# Altium PCB Studio_Clock_hv1.01_PCB_240215a.PcbDoc (part 3 of 5)
Units mm, origin at the board's own origin, x right, y up, seen from the top; angles counter-clockwise.
Board outline 360 x 60 mm, 4 copper layers (TOP, PWR, GND, BOTTOM), stack 0.547 mm thick; 257 components, 289 nets, 969 pads, 664 vias.
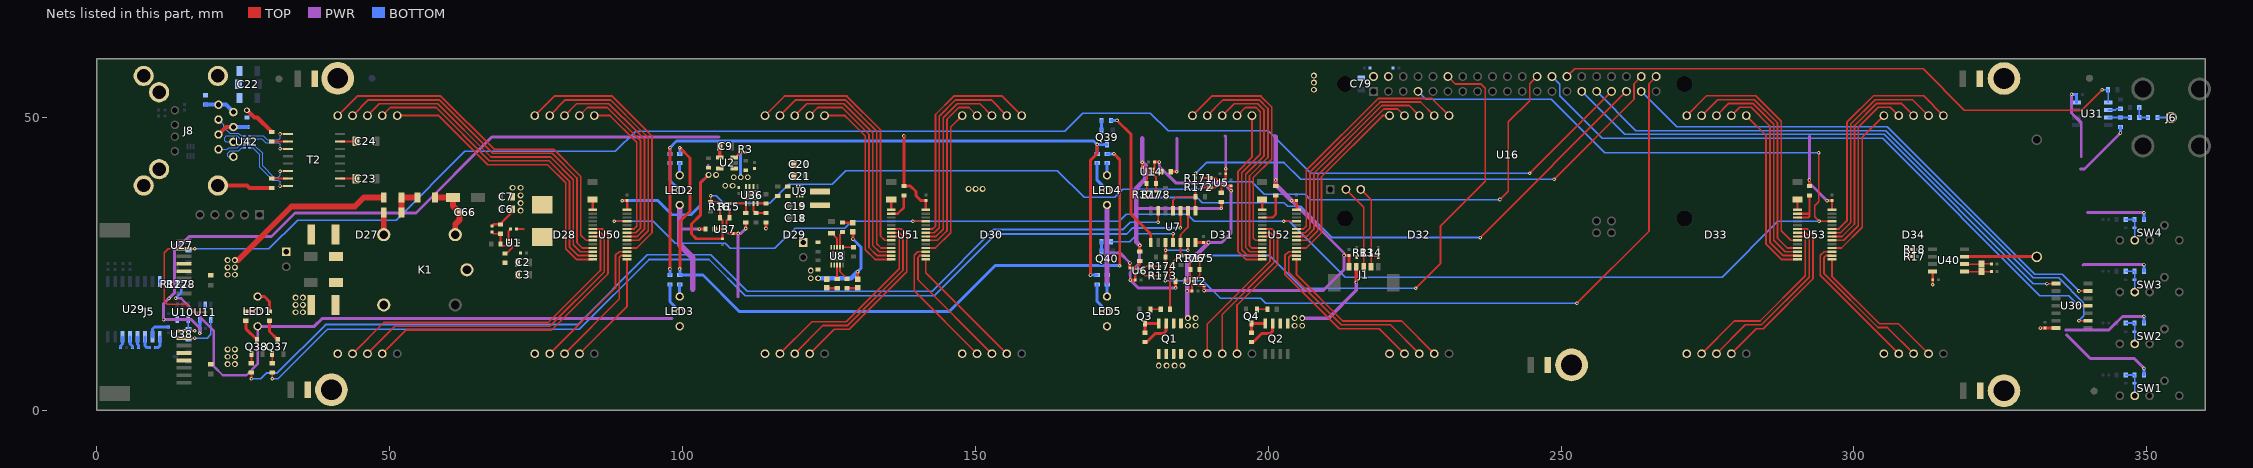
[diagram p4: the nets of this part, all layers, seen from the top]

## Part data (continued)
R5 R6: library part CMP-001-0628-7, "RES 33K OHM 1% 1/10W 0603", MAnufacturer=YAGEO, Op Temp max=155°C, Op Temp min=-55°C, Package="0603 (1608 Metric)", Power=100mW, Ratings=-, Resistance=33K, Temperature Coefficient=±100ppm, Tolerance=1%, Component Type="Chip Resistor", ComponentLink1Description=Datasheet, ComponentLink1URL=https://www.yageo.com/upload/media/product/products/datasheet/rchip/PYu-RC_51_RoHS_P_4.pdf, ComponentLink2Description=Mouser, ComponentLink2URL=https://eu.mouser.com/ProductDetail/YAGEO/RC0603FR-0710KL?qs=grNVn54RoB%252B3GtjbJj3wJQ%3D%3D, ComponentLink3Description=Digikey, ComponentLink3URL=https://www.digikey.com/en/products/detail/yageo/RC0603FR-0710KL/726880?s=N4IgTCBcDaIEoGEAMA2JBmAYnAtEg7AIxIDSAMiALoC%2BQA, Composition="Thick Film", Height max=550µm, Mounting type=SM, MPN=RC0603FR-0733KL, Size="1.60mm x 0.80mm", Size2=0603
R7 R8 R124 R125: library part RC_1206, "RES 0 OHM JUMPER 1/4W 1206", Package="1206 (3216 Metric)", Power=0.25W, Resistance=0E, Datasheet=https://www.yageo.com/upload/media/product/products/datasheet/rchip/PYu-RC_Group_51_RoHS_L_12.pdf, DigiKey=https://www.digikey.com/en/products/detail/yageo/RC1206JR-070RL/729184, MF=YAGEO, MPN=RC1206JR-070RL, Size2=1206
  R124 R125: DNP=DNP, PMNT=DNP
R9 R10 R11 R12: library part CMP-001-0628-7, "RES 75 OHM 1% 1/10W 0603", MAnufacturer=YAGEO, Op Temp max=155°C, Op Temp min=-55°C, Package="0603 (1608 Metric)", Power=100mW, Ratings=-, Resistance=75E, Temperature Coefficient=±100ppm, Tolerance=1%, Component Type="Chip Resistor", ComponentLink1Description=Datasheet, ComponentLink1URL=https://www.yageo.com/upload/media/product/products/datasheet/rchip/PYu-RC_51_RoHS_P_4.pdf, ComponentLink2Description=Mouser, ComponentLink2URL=https://eu.mouser.com/ProductDetail/YAGEO/RC0603FR-0710KL?qs=grNVn54RoB%252B3GtjbJj3wJQ%3D%3D, ComponentLink3Description=Digikey, ComponentLink3URL=https://www.digikey.com/en/products/detail/yageo/RC0603FR-0710KL/726880?s=N4IgTCBcDaIEoGEAMA2JBmAYnAtEg7AIxIDSAMiALoC%2BQA, Composition="Thick Film", Height max=550µm, Mounting type=SM, MPN=RC0603FR-0775RP, PMNT=DNP, Size="1.60mm x 0.80mm", Size2=0603
R13 R14 R15 R16 R130 R171 R172 R173 R174 R175 R176 R177 R178 R198 R205 R206: library part CMP-001-0484-6, "RES 33 OHM 1% 1/16W 0402", MAnufacturer=YAGEO, Op Temp max=155°C, Op Temp min=-55°C, Package="0402 (1005 Metric)", Package2=0402, Power=63mW, Ratings=-, Resistance=33, Temperature Coefficient=±100ppm, Tolerance=1%, Component Type="Chip Resistor", ComponentLink1Description=Datasheet, ComponentLink1URL=https://www.yageo.com/upload/media/product/productsearch/datasheet/rchip/PYu-RC_Group_51_RoHS_L_12.pdf, ComponentLink2Description=Mouser, ComponentLink2URL=https://eu.mouser.com/ProductDetail/YAGEO/RC0402FR-0727RL?qs=UOUeRUa%252B8Wlb37UyFHw9Bw%3D%3D, ComponentLink3Description=Digikey, ComponentLink3URL=https://www.digikey.com/en/products/detail/yageo/RC0402FR-0727RL/5280946, Composition="Thick Film", Height max=400µm, Mounting type=SM, MPN=RC0402FR-0733RL, Size="1.00mm x 0.50mm"
R17 R18: library part CMP-001-0484-6, "RES 4K7 OHM 1% 1/16W 0402", MAnufacturer=YAGEO, Op Temp max=155°C, Op Temp min=-55°C, Package="0402 (1005 Metric)", Package2=0402, Power=63mW, Ratings=-, Resistance=4K7, Temperature Coefficient=±100ppm, Tolerance=1%, Component Type="Chip Resistor", ComponentLink1Description=Datasheet, ComponentLink1URL=https://www.yageo.com/upload/media/product/productsearch/datasheet/rchip/PYu-RC_Group_51_RoHS_L_12.pdf, ComponentLink2Description=Mouser, ComponentLink2URL=https://eu.mouser.com/ProductDetail/YAGEO/RC0402FR-0727RL?qs=UOUeRUa%252B8Wlb37UyFHw9Bw%3D%3D, ComponentLink3Description=Digikey, ComponentLink3URL=https://www.digikey.com/en/products/detail/yageo/RC0402FR-0727RL/5280946, Composition="Thick Film", Height max=400µm, Mounting type=SM, MPN=RC0402FR-074K7L, Size="1.00mm x 0.50mm"
R19 R179 R181 R183 R185: library part CMP-001-0628-7, "RES 91 OHM 5% 1/10W 0603", MAnufacturer=YAGEO, Op Temp max=155°C, Op Temp min=-55°C, Package="0603 (1608 Metric)", Power=100mW, Ratings=-, Resistance=91E, Temperature Coefficient=±100ppm, Tolerance=1%, Component Type="Chip Resistor", ComponentLink1Description=Datasheet, ComponentLink1URL=https://www.yageo.com/upload/media/product/products/datasheet/rchip/PYu-RC_51_RoHS_P_4.pdf, ComponentLink2Description=Mouser, ComponentLink2URL=https://eu.mouser.com/ProductDetail/YAGEO/RC0603FR-0710KL?qs=grNVn54RoB%252B3GtjbJj3wJQ%3D%3D, ComponentLink3Description=Digikey, ComponentLink3URL=https://www.digikey.com/en/products/detail/yageo/RC0603FR-0710KL/726880?s=N4IgTCBcDaIEoGEAMA2JBmAYnAtEg7AIxIDSAMiALoC%2BQA, Composition="Thick Film", Height max=550µm, Mounting type=SM, MPN=RC0603JR-0791RL, PMNT=DNP, Size="1.60mm x 0.80mm", Size2=0603
R20 R180 R182 R184 R186: library part CMP-001-0628-7, "RES 150 OHM 5% 1/10W 0603", MAnufacturer=YAGEO, Op Temp max=155°C, Op Temp min=-55°C, Package="0603 (1608 Metric)", Power=100mW, Ratings=-, Resistance=150E, Temperature Coefficient=±100ppm, Tolerance=1%, Component Type="Chip Resistor", ComponentLink1Description=Datasheet, ComponentLink1URL=https://www.yageo.com/upload/media/product/products/datasheet/rchip/PYu-RC_51_RoHS_P_4.pdf, ComponentLink2Description=Mouser, ComponentLink2URL=https://eu.mouser.com/ProductDetail/YAGEO/RC0603FR-0710KL?qs=grNVn54RoB%252B3GtjbJj3wJQ%3D%3D, ComponentLink3Description=Digikey, ComponentLink3URL=https://www.digikey.com/en/products/detail/yageo/RC0603FR-0710KL/726880?s=N4IgTCBcDaIEoGEAMA2JBmAYnAtEg7AIxIDSAMiALoC%2BQA, Composition="Thick Film", Height max=550µm, Mounting type=SM, MPN=RC0603JR-07150RL, Size="1.60mm x 0.80mm", Size2=0603
R21 R187 R189 R191: library part RC_1206, "RES 910 OHM 1% 1/4W 1206", Package="1206 (3216 Metric)", Power=0.25W, Resistance=910E, Datasheet=https://www.yageo.com/upload/media/product/products/datasheet/rchip/PYu-RC_Group_51_RoHS_L_12.pdf, DigiKey=https://www.digikey.com/en/products/detail/yageo/RC1206FR-10910RL/14286762, MF=YAGEO, MPN=RC1206FR-10910RL, Size2=1206
R38 R39: library part CMP-001-0628-7, "RES 2.7K OHM 1% 1/10W 0603", MAnufacturer=YAGEO, Op Temp max=155°C, Op Temp min=-55°C, Package="0603 (1608 Metric)", Power=100mW, Ratings=-, Resistance=2K7, Temperature Coefficient=±100ppm, Tolerance=1%, Component Type="Chip Resistor", ComponentLink1Description=Datasheet, ComponentLink1URL=https://www.yageo.com/upload/media/product/products/datasheet/rchip/PYu-RC_51_RoHS_P_4.pdf, ComponentLink2Description=Mouser, ComponentLink2URL=https://eu.mouser.com/ProductDetail/YAGEO/RC0603FR-0710KL?qs=grNVn54RoB%252B3GtjbJj3wJQ%3D%3D, ComponentLink3Description=Digikey, ComponentLink3URL=https://www.digikey.com/en/products/detail/yageo/RC0603FR-0710KL/726880?s=N4IgTCBcDaIEoGEAMA2JBmAYnAtEg7AIxIDSAMiALoC%2BQA, Composition="Thick Film", Height max=550µm, Mounting type=SM, MPN=RC0603FR-072K7L, Size="1.60mm x 0.80mm", Size2=0603
R40 R41: library part CMP-001-0628-7, "RES 4.7K OHM 1% 1/10W 0603", MAnufacturer=YAGEO, Op Temp max=155°C, Op Temp min=-55°C, Package="0603 (1608 Metric)", Power=100mW, Ratings=-, Resistance=4K7, Temperature Coefficient=±100ppm, Tolerance=1%, Component Type="Chip Resistor", ComponentLink1Description=Datasheet, ComponentLink1URL=https://www.yageo.com/upload/media/product/products/datasheet/rchip/PYu-RC_51_RoHS_P_4.pdf, ComponentLink2Description=Mouser, ComponentLink2URL=https://eu.mouser.com/ProductDetail/YAGEO/RC0603FR-0710KL?qs=grNVn54RoB%252B3GtjbJj3wJQ%3D%3D, ComponentLink3Description=Digikey, Composition="Thick Film", Height max=550µm, Mounting type=SM, MPN=RC0603FR-074K7L, PMNT=DNP, Size="1.60mm x 0.80mm", Size2=0603
  R40: ComponentLink3URL=https://www.digikey.pl/en/products/detail/yageo/rc0603fr-074k7l/727212
  R41: ComponentLink3URL=https://www.digikey.com/en/products/detail/yageo/RC0603FR-0710KL/726880?s=N4IgTCBcDaIEoGEAMA2JBmAYnAtEg7AIxIDSAMiALoC%2BQA
R42 R48 R74 R160: library part CMP-001-0628-7, "RES 0 OHM JUMPER 1/10W 0603", MAnufacturer=YAGEO, MPN=RC0603FR-0710KL, Op Temp max=155°C, Op Temp min=-55°C, Package="0603 (1608 Metric)", Power=100mW, Ratings=-, Temperature Coefficient=±100ppm, Tolerance=1%, Component Type="Chip Resistor", ComponentLink1Description=Datasheet, ComponentLink1URL=https://www.yageo.com/upload/media/product/products/datasheet/rchip/PYu-RC_51_RoHS_P_4.pdf, ComponentLink2Description=Mouser, ComponentLink2URL=https://eu.mouser.com/ProductDetail/YAGEO/RC0603FR-0710KL?qs=grNVn54RoB%252B3GtjbJj3wJQ%3D%3D, ComponentLink3Description=Digikey, ComponentLink3URL=https://www.digikey.com/en/products/detail/yageo/RC0603FR-0710KL/726880?s=N4IgTCBcDaIEoGEAMA2JBmAYnAtEg7AIxIDSAMiALoC%2BQA, Composition="Thick Film", DNP=DNP, Height max=550µm, Mounting type=SM, PMNT=DNP, Resistance=DNP, Size="1.60mm x 0.80mm", Size2=0603
R43 R49 R69 R75: library part CMP-001-0628-7, "RES 0 OHM JUMPER 1/10W 0603", MAnufacturer=YAGEO, MPN=RC0603FR-0710KL, Op Temp max=155°C, Op Temp min=-55°C, Package="0603 (1608 Metric)", Power=100mW, Ratings=-, Resistance=0E, Temperature Coefficient=±100ppm, Tolerance=1%, Component Type="Chip Resistor", ComponentLink1Description=Datasheet, ComponentLink1URL=https://www.yageo.com/upload/media/product/products/datasheet/rchip/PYu-RC_51_RoHS_P_4.pdf, ComponentLink2Description=Mouser, ComponentLink2URL=https://eu.mouser.com/ProductDetail/YAGEO/RC0603FR-0710KL?qs=grNVn54RoB%252B3GtjbJj3wJQ%3D%3D, ComponentLink3Description=Digikey, ComponentLink3URL=https://www.digikey.com/en/products/detail/yageo/RC0603FR-0710KL/726880?s=N4IgTCBcDaIEoGEAMA2JBmAYnAtEg7AIxIDSAMiALoC%2BQA, Composition="Thick Film", Height max=550µm, Mounting type=SM, PMNT=DNP, Size="1.60mm x 0.80mm", Size2=0603
R45 R51 R71 R77 R161: library part CMP-001-0628-7, "RES SMD 5.6K OHM 5% 1/10W 0603", MAnufacturer=YAGEO, MPN=DNP, Op Temp max=155°C, Op Temp min=-55°C, Package="0603 (1608 Metric)", Power=100mW, Ratings=-, Resistance=5K6, Temperature Coefficient=±100ppm, Tolerance=1%, Component Type="Chip Resistor", ComponentLink1Description=Datasheet, ComponentLink1URL=https://www.yageo.com/upload/media/product/products/datasheet/rchip/PYu-RC_51_RoHS_P_4.pdf, ComponentLink2Description=Mouser, ComponentLink2URL=https://eu.mouser.com/ProductDetail/YAGEO/RC0603FR-0710KL?qs=grNVn54RoB%252B3GtjbJj3wJQ%3D%3D, ComponentLink3Description=Digikey, ComponentLink3URL=https://www.digikey.com/en/products/detail/yageo/RC0603FR-0710KL/726880?s=N4IgTCBcDaIEoGEAMA2JBmAYnAtEg7AIxIDSAMiALoC%2BQA, Composition="Thick Film", Height max=550µm, Mounting type=SM, Size="1.60mm x 0.80mm", Size2=0603
  R161: DNP=DNP
R46 R47 R53 R55: library part CMP-001-0628-7, "RES 2.2K OHM 1% 1/10W 0603", MAnufacturer=YAGEO, Op Temp max=155°C, Op Temp min=-55°C, Package="0603 (1608 Metric)", Power=100mW, Ratings=-, Resistance=2K2, Temperature Coefficient=±100ppm, Tolerance=1%, Component Type="Chip Resistor", ComponentLink1Description=Datasheet, ComponentLink1URL=https://www.yageo.com/upload/media/product/products/datasheet/rchip/PYu-RC_51_RoHS_P_4.pdf, ComponentLink2Description=Mouser, ComponentLink2URL=https://eu.mouser.com/ProductDetail/YAGEO/RC0603FR-0710KL?qs=grNVn54RoB%252B3GtjbJj3wJQ%3D%3D, ComponentLink3Description=Digikey, Composition="Thick Film", Height max=550µm, Mounting type=SM, MPN=RC0603FR-072K2L, PMNT=DNP, Size="1.60mm x 0.80mm", Size2=0603
  R46 R47: ComponentLink3URL=https://www.digikey.com/en/products/detail/yageo/RC0603FR-0710KL/726880?s=N4IgTCBcDaIEoGEAMA2JBmAYnAtEg7AIxIDSAMiALoC%2BQA
  R53 R55: ComponentLink3URL=https://www.digikey.pl/en/products/detail/yageo/rc0603fr-072k2l/727016
R56 R57 R58: library part CMP-001-0628-7, "RES 470 OHM 1% 1/10W 0603", MAnufacturer=YAGEO, Op Temp max=155°C, Op Temp min=-55°C, Package="0603 (1608 Metric)", Power=100mW, Ratings=-, Resistance=470E, Temperature Coefficient=±100ppm, Tolerance=1%, Component Type="Chip Resistor", ComponentLink1Description=Datasheet, ComponentLink1URL=https://www.yageo.com/upload/media/product/products/datasheet/rchip/PYu-RC_51_RoHS_P_4.pdf, ComponentLink2Description=Mouser, ComponentLink2URL=https://eu.mouser.com/ProductDetail/YAGEO/RC0603FR-0710KL?qs=grNVn54RoB%252B3GtjbJj3wJQ%3D%3D, ComponentLink3Description=Digikey, ComponentLink3URL=https://www.digikey.com/en/products/detail/yageo/RC0603FR-0710KL/726880?s=N4IgTCBcDaIEoGEAMA2JBmAYnAtEg7AIxIDSAMiALoC%2BQA, Composition="Thick Film", Height max=550µm, Mounting type=SM, MPN=RC0603FR-07470RL, Size="1.60mm x 0.80mm", Size2=0603
R59: library part CMP-001-0628-7, "RES 732K OHM 1% 1/10W 0603", MAnufacturer=YAGEO, Op Temp max=155°C, Op Temp min=-55°C, Package="0603 (1608 Metric)", Power=100mW, Ratings=-, Resistance=732K, Temperature Coefficient=±100ppm, Tolerance=1%, Component Type="Chip Resistor", ComponentLink1Description=Datasheet, ComponentLink1URL=https://www.digikey.ee/en/products/detail/yageo/rc0603fr-07100rp/4935304, ComponentLink3Description=Digikey, ComponentLink3URL=https://www.digikey.com/en/products/detail/yageo/rc0603fr-07732kl/727376, Composition="Thick Film", Height max=550µm, Mounting type=SM, MPN=RC0603FR-07732KL, Size="1.60mm x 0.80mm", Size2=0603
R61 R154: library part CMP-001-0628-7, "RES 1K OHM 1% 1/10W 0603", MAnufacturer=YAGEO, Op Temp max=155°C, Op Temp min=-55°C, Package="0603 (1608 Metric)", Power=100mW, Ratings=-, Resistance=1K, Temperature Coefficient=±100ppm, Tolerance=1%, Component Type="Chip Resistor", ComponentLink1Description=Datasheet, ComponentLink1URL=https://www.digikey.ee/en/products/detail/yageo/rc0603fr-07100rp/4935304, ComponentLink3Description=Digikey, ComponentLink3URL=https://www.digikey.com/en/products/detail/yageo/RC0603FR-0710KL/726880?s=N4IgTCBcDaIEoGEAMA2JBmAYnAtEg7AIxIDSAMiALoC%2BQA, Composition="Thick Film", Height max=550µm, Mounting type=SM, MPN=RC0603FR-071KL, Size="1.60mm x 0.80mm", Size2=0603
R62: library part CMP-001-0694-4, "THERMISTOR NTC 10KOHM 3570K 0805", MAnufacturer="Vishay Beyschlag/Draloric/BC Components", Op Temp max=155°C, Package="0805 (2012 Metric)", Resistance=10K, Tolerance=±3%, Component Type="Chip Resistor", ComponentLink1Description=Datasheet, ComponentLink1URL=https://www.vishay.com/docs/29044/ntcs0805e3t.pdf, ComponentLink3Description=Digikey, ComponentLink3URL=https://www.digikey.com/en/products/detail/vishay-beyschlag-draloric-bc-components/ntcs0805e3103hmt/2237369, Mounting type=SM, MPN=NTCS0805E3103HMT, Size2=0805
R63 R199 R200: library part CMP-001-0628-7, "RES 100K OHM 1% 1/10W 0603", MAnufacturer=YAGEO, Op Temp max=155°C, Op Temp min=-55°C, Package="0603 (1608 Metric)", Power=100mW, Ratings=-, Resistance=100K, Temperature Coefficient=±100ppm, Tolerance=1%, Component Type="Chip Resistor", ComponentLink1Description=Datasheet, ComponentLink3Description=Digikey, Composition="Thick Film", Height max=550µm, Mounting type=SM, MPN=RC0603FR-07100KL, Size="1.60mm x 0.80mm", Size2=0603
  R63: ComponentLink1URL=https://www.digikey.ee/en/products/detail/yageo/rc0603fr-07100rp/4935304, ComponentLink3URL=https://www.digikey.com/en/products/detail/yageo/rc0603fr-07100kl/726889
  R199 R200: ComponentLink1URL=https://www.yageo.com/upload/media/product/products/datasheet/rchip/PYu-RC_51_RoHS_P_4.pdf, ComponentLink2Description=Mouser, ComponentLink2URL=https://eu.mouser.com/ProductDetail/YAGEO/RC0603FR-0710KL?qs=grNVn54RoB%252B3GtjbJj3wJQ%3D%3D, ComponentLink3URL=https://www.digikey.com/en/products/detail/yageo/RC0603FR-0710KL/726880?s=N4IgTCBcDaIEoGEAMA2JBmAYnAtEg7AIxIDSAMiALoC%2BQA
R67: library part CMP-001-0628-7, "RES 0 OHM JUMPER 1/10W 0603", MAnufacturer=YAGEO, MPN=RC0603FR-0710KL, Op Temp max=155°C, Op Temp min=-55°C, Package="0603 (1608 Metric)", Power=100mW, Ratings=-, Resistance=DNP, Temperature Coefficient=±100ppm, Tolerance=1%, Component Type="Chip Resistor", ComponentLink1Description=Datasheet, ComponentLink1URL=https://www.yageo.com/upload/media/product/products/datasheet/rchip/PYu-RC_51_RoHS_P_4.pdf, ComponentLink2Description=Mouser, ComponentLink2URL=https://eu.mouser.com/ProductDetail/YAGEO/RC0603FR-0710KL?qs=grNVn54RoB%252B3GtjbJj3wJQ%3D%3D, ComponentLink3Description=Digikey, ComponentLink3URL=https://www.digikey.com/en/products/detail/yageo/RC0603FR-0710KL/726880?s=N4IgTCBcDaIEoGEAMA2JBmAYnAtEg7AIxIDSAMiALoC%2BQA, Composition="Thick Film", DNP=DNP, Height max=550µm, Mounting type=SM, PMNT=DNP, Size="1.60mm x 0.80mm", Size2=0603
R92 R93 R94 R95 R96: library part SMD_RESISTOR, Voltage=50V, DNP=DNP, Foot Print Size=1210, PCB Footprint=r_sm_1210, Tollerance=5%
R126: library part RT1206BRD07100RL, "RES 330 OHM 5% 1/4W 1206", Package="1206 (3216 Metric)", Power=0.25W, Resistance=330E, Tolerance=5%, Datasheet=https://www.yageo.com/upload/media/product/app/datasheet/rchip/pyu-rt_1-to-0.01_rohs_l.pdf, DigiKey=https://www.digikey.sk/en/products/detail/yageo/RT1206BRD07130RL/1079510, MF=YAGEO, MPN=RC1206JR-07330RL, Size=1206
R133: library part CMP-001-0484-6, "RES SMD 0 OHM JUMPER 1/16W 0402", MAnufacturer=YAGEO, Op Temp max=155°C, Op Temp min=-55°C, Package="0402 (1005 Metric)", Power=63mW, Ratings=-, Resistance=0E, Temperature Coefficient=±100ppm, Tolerance=Jumper, Component Type="Chip Resistor", ComponentLink1Description=Datasheet, ComponentLink1URL=https://www.yageo.com/upload/media/product/productsearch/datasheet/rchip/PYu-RC_Group_51_RoHS_L_12.pdf, ComponentLink2Description=Mouser, ComponentLink2URL=https://eu.mouser.com/ProductDetail/YAGEO/RC0402FR-0727RL?qs=UOUeRUa%252B8Wlb37UyFHw9Bw%3D%3D, ComponentLink3Description=Digikey, ComponentLink3URL=https://www.digikey.com/en/products/detail/yageo/RC0402FR-0727RL/5280946, Composition="Thick Film", Height max=400µm, Mounting type=SM, MPN=AC0402JR-070RL, Size="1.00mm x 0.50mm"
R156: library part CMP-001-0628-7, "RES 402 OHM 1% 1/10W 0603", MAnufacturer=YAGEO, Op Temp max=155°C, Op Temp min=-55°C, Package="0603 (1608 Metric)", Power=100mW, Ratings=-, Resistance=402E, Temperature Coefficient=±100ppm, Tolerance=1%, Component Type="Chip Resistor", ComponentLink1Description=Datasheet, ComponentLink1URL=https://www.yageo.com/upload/media/product/products/datasheet/rchip/PYu-RC_51_RoHS_P_4.pdf, ComponentLink2Description=Mouser, ComponentLink2URL=https://eu.mouser.com/ProductDetail/YAGEO/RC0603FR-0710KL?qs=grNVn54RoB%252B3GtjbJj3wJQ%3D%3D, ComponentLink3Description=Digikey, ComponentLink3URL=https://www.digikey.com/en/products/detail/yageo/RC0603FR-0710KL/726880?s=N4IgTCBcDaIEoGEAMA2JBmAYnAtEg7AIxIDSAMiALoC%2BQA, Composition="Thick Film", Height max=550µm, Mounting type=SM, MPN=RC0603FR-07402RP, PMNT=DNP, Size="1.60mm x 0.80mm", Size2=0603
R159: library part CMP-001-0628-7, "RES 0 OHM JUMPER 1/10W 0603", MAnufacturer=YAGEO, Op Temp max=155°C, Op Temp min=-55°C, Package="0603 (1608 Metric)", Power=100mW, Ratings=-, Resistance=0E, Temperature Coefficient=±100ppm, Tolerance=1%, Component Type="Chip Resistor", ComponentLink1Description=Datasheet, ComponentLink1URL=https://www.yageo.com/upload/media/product/products/datasheet/rchip/PYu-RC_51_RoHS_P_4.pdf, ComponentLink2Description=Mouser, ComponentLink2URL=https://eu.mouser.com/ProductDetail/YAGEO/RC0603FR-0710KL?qs=grNVn54RoB%252B3GtjbJj3wJQ%3D%3D, ComponentLink3Description=Digikey, ComponentLink3URL=https://www.digikey.com/en/products/detail/yageo/RC0603FR-0710KL/726880?s=N4IgTCBcDaIEoGEAMA2JBmAYnAtEg7AIxIDSAMiALoC%2BQA, Composition="Thick Film", Height max=550µm, Mounting type=SM, MPN=RC0603FR-0710KL, PMNT=DNP, Size="1.60mm x 0.80mm", Size2=0603
R201: library part CMP-001-0628-7, "RES 51K OHM 1% 1/10W 0603", MAnufacturer=YAGEO, Op Temp max=155°C, Op Temp min=-55°C, Package="0603 (1608 Metric)", Power=100mW, Ratings=-, Resistance=51K, Temperature Coefficient=±100ppm, Tolerance=1%, Component Type="Chip Resistor", ComponentLink1Description=Datasheet, ComponentLink1URL=https://www.yageo.com/upload/media/product/products/datasheet/rchip/PYu-RC_51_RoHS_P_4.pdf, ComponentLink2Description=Mouser, ComponentLink2URL=https://eu.mouser.com/ProductDetail/YAGEO/RC0603FR-0710KL?qs=grNVn54RoB%252B3GtjbJj3wJQ%3D%3D, ComponentLink3Description=Digikey, ComponentLink3URL=https://www.digikey.com/en/products/detail/yageo/RC0603FR-0710KL/726880?s=N4IgTCBcDaIEoGEAMA2JBmAYnAtEg7AIxIDSAMiALoC%2BQA, Composition="Thick Film", Height max=550µm, Mounting type=SM, MPN=RC0603FR-0751KP, Size="1.60mm x 0.80mm", Size2=0603
R1588: library part CMP-001-0628-7, "RES 32.4K OHM 1% 1/10W 0603", MAnufacturer=YAGEO, Op Temp max=155°C, Op Temp min=-55°C, Package="0603 (1608 Metric)", Power=100mW, Ratings=-, Resistance=32K4, Temperature Coefficient=±100ppm, Tolerance=1%, Component Type="Chip Resistor", ComponentLink1Description=Datasheet, ComponentLink1URL=https://www.yageo.com/upload/media/product/products/datasheet/rchip/PYu-RC_51_RoHS_P_4.pdf, ComponentLink2Description=Mouser, ComponentLink2URL=https://eu.mouser.com/ProductDetail/YAGEO/RC0603FR-0710KL?qs=grNVn54RoB%252B3GtjbJj3wJQ%3D%3D, ComponentLink3Description=Digikey, ComponentLink3URL=https://www.digikey.com/en/products/detail/yageo/RC0603FR-0710KL/726880?s=N4IgTCBcDaIEoGEAMA2JBmAYnAtEg7AIxIDSAMiALoC%2BQA, Composition="Thick Film", Height max=550µm, Mounting type=SM, MPN=RC0603FR-0732K4L, PMNT=DNP, Size="1.60mm x 0.80mm", Size2=0603
SW1 SW2 SW3 SW4: "SWITCH PUSH SPDT 0.4VA 28V", Mfr_Name="NKK Switches", Voltage=28V, ComponentLink1Description=Datasheet, ComponentLink1URL=https://www.nkkswitches.com/pdf/Apushbuttons.pdf, ComponentLink2Description=DigiKey, ComponentLink2URL=https://www.digikey.ee/en/products/detail/nkk-switches/AB15AV-FA/1055811, MPN=AB15AV-FA, Type=SPDT
T2: "MODULE XFRMR SGL ETHR LAN 16SOIC", Mfr_Name="Pulse Electronics Corporation", ComponentLink1Description=DigiKey, ComponentLink1URL=https://www.digikey.com/en/products/detail/pulse-electronics/HX1188/754321, Copyright="Copyright (C) 2024 Ultra Librarian. All rights reserved.", MPN=HX1188FNL, RefDes=RefDes, Type=DEV
U1: "IC REG BUCK ADJ 2A SOT563", Current - Output=2A, Frequency - Switching=580kHz, Mfr_Name="Texas Instruments", Voltage - Input (Max)=17V, Voltage - Input (Min)=4.3V, ComponentLink1Description=DigiKey, ComponentLink1URL=https://www.digikey.com/en/products/detail/texas-instruments/tps562207drlr/13213542, MPN=TPS562207DRLR
U2: "IC REG LINEAR 3.3V 300MA SOT23-5", Mfr_Name="Richtek Technology", MPN=RT9193-33GB
U5 U6 U12 U14: "IC TRANSLTR BIDIRECTIONAL 6XSON", Mfr_Name=Nexperia, Voltage min="1.2 V", Moltage max="5.5 V", MPN=74LVCH1T45GM,132
U7: "IC GATE AND 4CH 2-INP 14SOIC", Package="SOIC-14 ON", Voltage="4.5V - 5.5V", MF=onsemi, MPN=74ACT08SC
U8: library part MCP73833T-AMIMF, "IC BATT CONTRL LI-ION 1CEL 10DFN", Battery Pack Voltage=4.2V, Charge Current - Max=1.1A, Mfr_Name=Microchip, Voltage - Supply (Max)=6V, MPN=MCP73833T-AMI/MF
U9: "IC REG BOOST ADJ 3A SOT563", Current - Output=3A, Frequency - Switching=1MHz, Mfr_Name="Texas Instruments", Voltage - Input (Max)=5.5V, Voltage - Input (Min)=0.5V, ComponentLink1Description=DigiKey, ComponentLink1URL=https://www.digikey.com/en/products/detail/texas-instruments/tps61023drlt/11310622, ComponentLink2Description=Datasheet, ComponentLink2URL=https://www.ti.com/general/docs/suppproductinfo.tsp?distId=10&gotoUrl=https%3A%2F%2Fwww.ti.com%2Flit%2Fgpn%2Ftps61023, Manufacturer_Part_Number=TPS61023DRLT
U10 U11: "IC BUFFER NON-INVERT 5.5V 5TSOP", Logic Type="Buffer, Non-Inverting", Manufacturer_Part_Number=M74VHC1GT50DTT1G, MPN=M74VHC1GT50DTT1G
U16: "Single board computer", ComponentLink1Description=Datasheet, ComponentLink1URL=https://wiki.banana-pi.org/Banana_Pi_BPI-M2_ZERO
U27 U28 U38 U39: "TVS DIODE 24VWM 70VC TO236AB", Current - Peak Pulse (10/1000µs)="3A (8/20µs)", Mfr_Name=Nexperia, Voltage - Reverse Standoff (Typ)=24V, ComponentLink1Description=DigiKey, ComponentLink1URL=https://www.digikey.at/en/products/detail/nexperia-usa-inc/pesd1can-215/1157428, ComponentLink2Description=Datasheet, ComponentLink2URL=https://assets.nexperia.com/documents/data-sheet/PESD1CAN.pdf, MPN=PESD1CAN,215, Type=DEV
U29: "IC TRANSCEIVER FULL 2/2 16SOIC", Mfr_Name="Texas Instruments", Copyright="Copyright (C) 2024 Ultra Librarian. All rights reserved.", MPN=MAX232DWG4, RefDes=RefDes, Type=DEV
U30: "IC INVERT SCHMITT 6CH 1IN 14SOIC", Mfr_Name=onsemi, Supply Voltage max=5.5V, Supply Voltage min=2V, ComponentLink1Description=DigiKey, ComponentLink1URL=https://www.digikey.at/en/products/detail/onsemi/MC74VHC14DG/1480797?s=N4IgTCBcDaILIGEDsAWAagCQQRhQEQHEQBdAXyA, ComponentLink2Description="New link", ComponentLink2URL=https://www.onsemi.com/pdf/datasheet/mc74vhc14-d.pdf, Logic Type=Inverter, MPN=MC74VHC14DG
U31: library part MCP602T-ISN, "No Description Available", Mfr_Name=Microchip, Copyright="Copyright (C) 2024 Ultra Librarian. All rights reserved.", MPN=MCP602T-I/SN, RefDes=RefDes, Type=DEV
U36: "IC OR CTRLR SRC SELECT 8SON", Current - Output (Max)=1.25A, Mfr_Name="Texas Instruments", Voltage - Supply="2.8V ~ 5.5V", ComponentLink1Description=DigiKey, ComponentLink1URL=https://www.digikey.com/en/products/detail/texas-instruments/TPS2113ADRBR/2353703?s=N4IgTCBcDaICoAUDKYCMqDMBBAIgJQCE8QBdAXyA, ComponentLink2Description=Datasheet, ComponentLink2URL=https://www.ti.com/general/docs/suppproductinfo.tsp?distId=10&gotoUrl=https%3A%2F%2Fwww.ti.com%2Flit%2Fgpn%2Ftps2113a, MPN=TPS2113ADRBR, Type="Source Selector Switch"
U37: "IC TRANSLTR BIDIRECTIONAL 6XSON", Voltage min="1.2 V", DNP=DNP, Moltage max="5.5 V", MPN=74LVCH1T45GM,132, PMT=DNP
U40: library part DS1338Z-33+TR, "IC RTC CLK/CALENDAR I2C 8SOIC", Operating Temperature MAX="+ 85°C", Operating Temperature MIN=-40°C, Package=SOIC-8, Voltage - Supply="3V ~ 5.5V", Voltage - Supply, Battery="1.3V ~ 3.7V", ComponentLink1Description=Datasheet, ComponentLink1URL=https://www.analog.com/media/en/technical-documentation/data-sheets/DS1338-DS1338Z.pdf, ComponentLink2Description=DigiKey, ComponentLink2URL=https://www.digikey.ee/en/products/detail/analog-devices-inc-maxim-integrated/DS1338Z-33-T-R/1196924, MFN=DS1338Z-33+T&R
U42: "TVS DIODE 3.6VWM 14VC 10USON", Mfr_Name="Texas Instruments", ComponentLink1Description=DigiKey, ComponentLink1URL=https://www.digikey.com/en/products/detail/texas-instruments/esd224dqar/8601783, ComponentLink2Description=Datashet, ComponentLink2URL=https://www.ti.com/general/docs/suppproductinfo.tsp?distId=10&gotoUrl=https%3A%2F%2Fwww.ti.com%2Flit%2Fgpn%2Fesd224, Copyright="Copyright (C) 2024 Ultra Librarian. All rights reserved.", MPN=ESD224DQAR, RefDes=RefDes, Type=DEV
U50 U51 U52 U53: "IC LED DRV LIN I2C 120MA 28TSSOP", Mfr_Name="Texas Instruments", ComponentLink1Description=Datasheet, ComponentLink1URL=https://www.ti.com/lit/ds/symlink/tlc59116-q1.pdf?ts=1707339950007&ref_url=https%253A%252F%252Fwww.ti.com%252Fproduct%252FTLC59116-Q1, ComponentLink2Description=DigiKey, ComponentLink2URL=https://www.digikey.com/en/products/detail/texas-instruments/tlc59116itpwrq1/6005364, Copyright="Copyright (C) 2024 Ultra Librarian. All rights reserved.", MPN=TLC59116ITPWRQ1, RefDes=RefDes, Type=DEV
XTAL1: "CRYSTAL 32.7680KHZ 9PF SMD", Frequency="32.768 kHz", Mfr_Name=Epson, MPN="FC2012AN 32.768K-90NN60KD7"
SS1 SS2 SS3 SS4 SS5: CLASS=IC, PCB Footprint=spacer_139t

## Via types
v1: diameter 0.6, hole 0.3, TOP to BOTTOM, 539 vias
v2: diameter 1, hole 0.6, TOP to BOTTOM, 125 vias

## Nets (pads, with @x,y where several pads share a name; then routed paths per layer and width w, separated by ;. In a path a pad name is that pad's centre, name@x,y a point inside that pad or via, vN(x,y) a via of type N, cw(c..) or ccw(c..) an arc to the next point about the centre after c; other vN are vias at no path point)
12V0_DNP: 
+3V3: C10.1 C11.1 C12.2 C14.2 C25.2 C27.2 C28.2 C29.2 C33.2 C65.1 C76.2 C77.2 C78.1 C80.1 C81.1 C85.2 J1.1 R17.2 R18.2 R43.2 R49.2 R69.2 R75.2 R127.2 R135.2 R136.2 R137.2 R138.2 R188.2 R190.2 R192.2 R200.1 U2.5 U5.1 U6.1 U10.5 U11.5 U12.1 U14.1 U30.14 U31.8 U37.6 U40.8 U50.28 U51.28 U52.28 U53.28 | length 418.4
  TOP w0.35: C85.2@106.85,29.3 106.863,29.313 U37.6@106.863,30.45 ; C14.2@177.3,22.25 177.3,23.213 U6.1@177.55,23.463 ; C29.2@178.5,41.5 179.463,41.5 U14.1@179.713,41.25 ; U12.1@187.837,21.55 188.087,21.3 C25.2@189.05,21.3 ; U5.1@192.5,39.187 192.75,39.437 C12.2@192.75,40.4
  TOP w0.4: U50.28@90.538,34.225 90.55,34.237 C65.1@90.55,35.8 ; U51.28@141.538,34.225 141.55,34.237 C78.1@141.55,35.8 ; U52.28@204.838,34.225 204.85,34.237 C80.1@204.85,35.8 ; U53.28@296.238,34.225 296.25,34.237 C81.1@296.25,35.8
  TOP w0.5: v1(89.7,35.8) C65.1@90.55,35.8 ; v2(104.45,40.2) 103.05,38.8 103.05,33.3 101.55,31.8 101.55,30.1 102.35,29.3 C85.2@106.85,29.3 ; v1(137.8,46.85) R190.2@137.8,38.3 138.9,38.3 139.85,37.35 139.85,36.65 140.7,35.8 C78.1@141.55,35.8 ; v1(176.45,22.25) C14.2@177.3,22.25 ; R49.2@178.05,27.1 v1(178.05,28.15) ; C29.2@178.5,41.5 v1(178.5,42.35) ; R75.2@183.35,40.75 v1(184.4,40.75) ; v1(184.2,20.9) R69.2@184.2,22.05 ; v1(189.05,20.45) C25.2@189.05,21.3 ; v1(192,34.5) R43.2@192,35.55 ; C12.2@192.75,40.4 v1(192.75,41.25) ; R188.2@201.3,38.3 v1(201.3,39.35) ; v1(204,35.8) C80.1@204.85,35.8 ; v1(212.95,26.45) C33.2@213.8,26.45 J1.1@213.8,24.55 ; R192.2@292.4,38.3 v1(292.4,39.35) ; v1(295.4,35.8) C81.1@296.25,35.8 ; v1(309,26.25) R17.2@309.85,26.25 ; v1(309,27.5) R18.2@309.85,27.5 ; U40.8@313.438,23.695 313.45,23.683 C28.2@313.45,22.3 v1(313.45,21.45) ; v1(331.8,14.05) C76.2@332.65,14.05 334.465,14.05 U30.14@334.475,14.04
  PWR w0.5: v1(17.6,13.15) 17.6,14.05 16.15,15.5 v1(11.4,15.5) 11.4,18.2 v1(12.35,19.15) 13.25,20.05 13.25,27.2 15.75,29.7 29.85,29.7 33.85,33.7 54.5,33.7 67.45,46.65 106.25,46.65 ; 104.35,41.75 104.4,41.8 ; 177.45,34.5 v1(192,34.5) ; v1(178.05,28.15) 178.05,25.15 176.45,23.55 v1(176.45,22.25) 177.8,20.9 v1(184.2,20.9) ; v1(184.4,40.75) 184.4,46.4 184.45,46.45 ; v1(189.05,20.45) 209.4,20.45 212.95,24 v1(212.95,26.45) 212.95,26.85 v1(204,35.8) ; 192.65,46.85 192.75,46.75 v1(192.75,41.25) ; 201.05,46.95 201.3,46.7 ; 292.45,46.8 292.4,46.75 v1(292.4,39.35) 292.4,38.8 v1(295.4,35.8) ; 336.15,13.75 343.55,13.75 345.85,16.05 v1(349.5,16.05) ; 336.3,12.9 340.35,8.85 347.85,8.85 v1(349.5,7.2) ; v1(337.15,53.95) 337.15,50.75 338.8,49.1 338.8,43.35 ; 338.65,41.2 339.35,41.2 v1(345.5,47.35) ; 339.1,24.8 339.2,24.9 v1(349.5,24.9) ; 339.9,33.75 v1(349.5,33.75)
  PWR w0.8: v1(178.05,28.15) 177.45,28.75 177.45,34.5 177.45,37.95 179.05,39.55 179.05,41.8 v1(178.5,42.35) 178.5,46.4 ; 201.3,46.7 v1(201.3,39.35) 201.3,38.5 v1(204,35.8)
  BOTTOM w0.4: v1(12.35,19.15) 13.35,20.15 R127.2@13.35,21
  BOTTOM w0.5: v1(11.4,15.5) U10.5@13.75,15.5 ; v1(17.6,13.15) C11.1@17.6,14 U11.5@17.6,15.5 ; v1(89.7,35.8) 95.8,35.8 98.2,33.4 101.45,33.4 103.05,35 103.05,38.8 v2(104.45,40.2) ; v1(337.15,53.95) C77.2@338,53.95 U31.8@338,52.555 ; v1(345.5,47.35) R200.1@345.5,48.4 ; R135.2@349.5,6.05 v1(349.5,7.2) ; R136.2@349.5,14.9 v1(349.5,16.05) ; R137.2@349.5,23.75 v1(349.5,24.9) ; R138.2@349.5,32.6 v1(349.5,33.75)
  other v2: 105.75,40.2
+5V: C8.2 C13.2 C15.2 C26.2 C30.2 C64.2 C79.2 C84.2 C96.2 C97.2 J1.2 LED1.2 LED2.2 LED3.2 LED4.2 LED5.2 Q1.1 Q1.2 Q1.3 Q2.1 Q2.2 Q2.3 R3.2 R38.2 R39.2 R128.2 R154.2 R160.2 U2.1 U2.3 U5.6 U6.6 U7.14 U12.6 U14.6 U16.2 U16.4 U36.7 U37.1 | length 241.5
  TOP w0.35: U37.1@107.537,30.45 107.787,30.2 C84.2@108.65,30.2 ; C15.2@176.4,24.3 177.387,24.3 U6.6@177.55,24.137 ; U14.6@180.387,41.25 180.55,41.413 C30.2@180.55,42.4 ; C26.2@187,20.4 187,21.387 U12.6@187.163,21.55 ; U5.6@192.5,38.513 192.663,38.35 C13.2@193.65,38.35
  TOP w0.5: v1(102.85,30.95) R160.2@103.9,30.95 ; C84.2@108.65,30.2 v1(109.5,30.2) ; U2.3@108.85,43.19 109.04,43.19 v1(109.9,44.05) R3.2@110.8,44.05 ; v1(110.8,31.05) R154.2@110.8,32.1 ; C15.2@176.4,24.3 v1(176.4,25.15) ; R38.2@178.95,11.65 179.25,11.65 180.75,13.15 182.15,13.15 182.565,13.565 Q1.3@182.565,14.855 ; C30.2@180.55,42.4 v1(181.4,42.4) ; v1(186.15,20.4) C26.2@187,20.4 ; U7.14@187.56,28.625 187.585,28.65 C64.2@188.95,28.65 v1(189.8,28.65) ; v1(193.65,37.5) C13.2@193.65,38.35 ; R39.2@197.15,11.65 197.45,11.65 198.95,13.15 200.35,13.15 200.765,13.565 Q2.3@200.765,14.855
  TOP w0.6: v1(215.05,21.85) J1.2@215.05,24.55
  PWR w0.4: v1(13.45,19.15) 14.4,19.15 20,13.55 20,7.5 21.5,6 25.55,6 27.461,7.912 LED1.2@27.461,14.351
  PWR w0.5: LED1.2@27.461,14.351 37.151,14.351 38.5,15.7 98.2,15.7 ; 99.55,30.95 v1(102.85,30.95) ; 109.5,19.4 v1(109.5,30.2) 109.95,30.2 v1(110.8,31.05) ; 172.5,26.9 174.65,26.9 v1(176.4,25.15) ; v1(181.4,42.4) 181.4,41.65 184.2,38.85 192.3,38.85 v1(193.65,37.5) 193.65,30.25 192.05,28.65 v1(189.8,28.65) ; v2@186.15,15.9 v2(186.3,15.75)
  PWR w0.6: v2(205.8,15.75) 210.3,15.75 215.05,20.5 v1(215.05,21.85)
  PWR w0.8: LED4.2@172.481,35.052 172.481,21.919 172.5,21.9 ; v2@186.15,15.9 v1(186.15,20.4) 186.15,25 v1(189.8,28.65)
  PWR w1: LED2.2@99.521,35.052 99.521,28.279 101.75,26.05 101.75,20.7
  BOTTOM w0.4: v1(13.45,19.15) 14.45,20.15 R128.2@14.45,21
  BOTTOM w0.5: v1(109.9,44.05) 109.9,39.85 v2(109.95,39.8)
  other v2: 186.3,14.45 187.6,14.45 204.5,14.45 205.8,14.45 187.6,15.75 204.5,15.75 148.85,37.8 150.05,37.8 151.25,37.8 108.75,39.8 111.15,39.8 207.8,54.75 207.8,55.95 207.8,57.15
+5V_BP: C20.2 C21.2 C93.1 R59.1 U9.6 U36.6
+5V_IN: C5.1 C6.2 C7.2 C16.2 C94.1 L1.2 LED6.1 LED7.1 LED8.1 R1.2 R1588.1 U8.1 U8.2 U36.8 | length 22.1
  TOP w0.4: C5.1@67.5,31.45 67.8,31.75 R1.2@68.95,31.75 68.95,31.85 70.95,33.85 C6.2@70.95,34.35
  TOP w0.5: v1(114.25,31.05) R1588.1@114.25,32.1 ; v1(129.1,29.25) LED6.1@129.1,30.5 ; LED7.1@129.9,22.4 v1(129.9,23.65)
  BOTTOM w0.5: v1(129.1,29.25) 130.45,27.9 130.45,24.2 v1(129.9,23.65)
  BOTTOM w0.8: v2(123.15,22.55) 128.8,22.55 v1(129.9,23.65)
  other v2: 121.9,22.55 121.9,23.85 72.35,34.1 72.35,35.4 72.35,36.7 71,38 72.35,38 107.3,38.35 108.55,38.35
+12V: C2.2 C3.2 C4.1 K1.1 R162.1 U1.1
+12V_Ext: D21.2 F3.2 K1.3 R125.2 | length 3.8
  TOP w1: K1.3@49,30 R125.2@49,33.8
+12V_Q: D23.1 D24.1 F1.1 J5.4 J5.5 J5.12 J5.13 R124.2 | length 29.8
  TOP w1: v2(23.6,25.65) 24.1,25.65 33.25,34.8 44.05,34.8 45.6,36.35 R124.2@49,36.35
  other v2: 22.35,7.91 23.6,7.91 22.35,9.16 23.6,9.16 22.35,10.41 23.6,10.41 33.95,16.75 35.2,16.75 33.95,18 35.2,18 33.95,19.25 35.2,19.25 22.35,23.15 23.6,23.15 22.35,24.4 23.6,24.4 22.35,25.65
AC_0_DNP: 
AC_1_DNP: 
AM_PM_CTRL: R171.2 U16.38 | length 87.7
  TOP w0.3: R171.2@187.6,39.65 v1(187.6,40.5) ; v1(248.8,39.45) 262.45,53.1 262.45,55.76 U16.38@263.69,57
  BOTTOM w0.3: v1(187.6,40.5) 189.4,42.3 202.7,42.3 205.55,39.45 v1(248.8,39.45)
BAT_ON: R16.1 R161.2 U16.24 | length 168.2
  TOP w0.25: v1(104.8,36.65) R161.2@104.8,35.6 106.1,35.6 R16.1@106.4,35.3 ; v1(239.55,36) 241,37.45 241,49.25 244.65,52.9 244.65,55.74 U16.24@245.91,57
  BOTTOM w0.25: v1(104.8,36.65) 105.75,36.65 107.05,35.35 114.9,35.35 118.15,38.6 125.6,38.6 127.9,40.9 164,40.9 168.55,36.35 173.8,36.35 175.2,37.75 188.4,37.75 189.65,39 197.2,39 199.3,36.9 206.3,36.9 207.2,36 v1(239.55,36)
BAT_ON_STAT: R15.2 R154.1 U36.1 | length 4.4
  TOP w0.35: R15.2@108,35.3 U36.1@110.825,35.3 110.825,33.725 R154.1@110.8,33.7
COMP: 
COMP_OPTO: 
CS: 
ERX_N: T2.9 U42.6 | length 7.7
  TOP w0.25: v1(31.3,47.2) 31.305,47.195 T2.9@32.642,47.195
  BOTTOM w0.2: U42.6@26.067,46.85 28.41,46.85 29.075,46.185 31.025,46.185 31.3,46.46 v1(31.3,47.2)
ERX_P: T2.11 U42.7 | length 7.7
  TOP w0.25: v1(31.3,44.65) 31.305,44.655 T2.11@32.642,44.655
  BOTTOM w0.2: U42.7@26.067,46.35 28.203,46.35 28.868,45.685 31.025,45.685 31.3,45.41 v1@31.3,44.66
ETX_N: T2.14 U42.9 | length 10.9
  TOP w0.25: v1@31.305,40.845 T2.14@32.642,40.845
  BOTTOM w0.2: U42.9@26.067,45.35 26.807,45.35 28.3,43.857 28.3,41.75 30.225,39.825 31.025,39.825 31.3,40.1 v1(31.3,40.84)
ETX_P: T2.16 U42.10 | length 11
  TOP w0.25: v1@31.305,38.305 T2.16@32.642,38.305
  BOTTOM w0.2: U42.10@26.067,44.85 26.6,44.85 27.8,43.65 27.8,41.543 30.018,39.325 31.025,39.325 31.3,39.05 v1(31.3,38.3)
FET_D: 
FET_G: 
FET_S: 
GND: 
GND_EARTH: 
GND_SIGNAL: 
GREEN_CTRL_IN: J5.2 U11.2 U16.33 U27.2 | length 285.5
  TOP w0.25: v1(16.75,27.58) J5.2@14.9,27.58 12.18,27.58 11.5,26.9 11.5,18.6 12,18.1 15.2,18.1 16.55,16.75 v1(18.55,16.75) ; v1(244.65,40.5) U16.33@258.61,54.46
  BOTTOM w0.25: U27.2@15.75,27.25 16,27.25 16.33,27.58 v1(16.75,27.58) 29.38,27.58 34.3,32.5 51.15,32.5 62.85,44.2 88.5,44.2 91.993,47.693 165.243,47.693 168.3,50.75 179.9,50.75 182.95,47.7 200.027,47.7 207.234,40.493 v1@244.65,40.493 ; v1(18.55,16.75) U11.2@18.55,18
GREEN_SEL: D27.5 D28.5 D29.5 D30.5 D31.5 D32.5 D33.5 D34.5 Q1.5 Q1.6 Q1.7 Q1.8
  other v2: 181.3,7.65 182.65,7.65 184,7.65 185.35,7.65
H_LED_CTRL: R173.2 U16.40 | length 117
  TOP w0.3: v1(182.45,22.15) R173.2@182.45,23 ; v1(252.7,18.3) 265,30.6 265,55.77 U16.40@266.23,57
  BOTTOM w0.3: v1(182.45,22.15) 188.85,22.15 191.85,19.15 198.75,19.15 199.6,18.3 v1(252.7,18.3)
IN_0: U16.31 U30.2 | length 103
  TOP w0.25: v1(338.4,15.3) 338.41,15.31 U30.2@339.925,15.31
  BOTTOM w0.25: U16.31@256.07,54.46 262.78,47.75 305.438,47.75 330.588,22.6 334.95,22.6 339.25,18.3 339.25,16.15 v1(338.4,15.3)
IN_1: U16.26 U30.4 | length 108.9
  TOP w0.25: v1(338.4,17.84) 338.41,17.85 U30.4@339.925,17.85
  BOTTOM w0.25: U16.26@248.45,57 249.75,55.7 249.75,53.7 257,46.45 304.9,46.45 331.75,19.6 336.64,19.6 v1(338.4,17.84)
IN_2: U16.37 U30.6 | length 90.4
  TOP w0.25: v1(338.4,20.38) 338.41,20.39 U30.6@339.925,20.39
  BOTTOM w0.25: U16.37@263.69,54.46 269.75,48.4 305.708,48.4 330.879,23.229 335.551,23.229 v1(338.4,20.38)
IN_3: U16.29 U30.8 | length 94.5
  TOP w0.25: v1(332.95,21.65) 332.96,21.66 U30.8@334.475,21.66
  BOTTOM w0.25: U16.29@253.53,54.46 260.89,47.1 305.169,47.1 330.619,21.65 v1(332.95,21.65)
LED_RESET: U16.7 U50.25 U51.25 U52.25 U53.25 | length 312.2
  TOP w0.25: v1(88.35,32.275) U50.25@90.538,32.275 ; v1(139.35,32.275) U51.25@141.538,32.275 ; v1(202.65,32.275) U52.25@204.838,32.275 ; v1(293.95,44) 293.95,35.6 293.3,34.95 293.3,33.025 v1(294.05,32.275) U53.25@296.238,32.275
  BOTTOM w0.25: v1(88.35,32.275) 95.001,32.275 98.726,28.55 107.276,28.55 108.151,27.675 115.775,27.675 119.225,31.125 127.725,31.125 128.875,32.275 v1(139.35,32.275) 174.575,32.275 175.8,33.5 186.176,33.5 187.401,32.275 v1(202.65,32.275) 203.625,32.275 213.15,22.75 277.488,22.75 287.013,32.275 v1(294.05,32.275) ; U16.7@225.59,54.46 226.9,53.15 248.33,53.15 257.48,44 v1(293.95,44)
LTC_GPIO: R201.1 U16.28 U31.1 | length 99.5
  TOP w0.25: U16.28@250.99,57 252.29,58.3 311.8,58.3 318.85,51.25 338.85,51.25 v1(342.35,54.75)
  BOTTOM w0.25: v1(342.35,54.75) R201.1@343.4,54.75 U31.1@343.4,52.555
NetB1_2: B1.2 U40.3 | length 12.4
  TOP w0.5: U40.3@318.862,26.235 331.165,26.235 B1.2@331.2,26.2
NetC1_1: C1.1 L1.1 U1.2 | length 1.3
  TOP w0.3: C1.1@71.65,30.95 72.85,30.95 72.9,30.9
NetC1_2: C1.2 U1.4 | length 2
  TOP w0.3: U1.4@70.312,29.1 70.312,30.612 C1.2@70.65,30.95
NetC5_2: C5.2 R1.1 R2.2 U1.6 | length 4.8
  TOP w0.3: C5.2@67.5,30.45 67.8,30.15 R1.1@68.95,30.15 R2.2@68.95,28.4 69.25,28.1 U1.6@70.312,28.1
NetC9_2: C9.2 U2.4 | length 1.9
  TOP w0.6: U2.4@106.35,43.19 C9.2@106.35,45.05
NetC17_2: C17.2 C18.2 C19.2 J11.1 L2.2 U8.9 U8.10 U9.2 U9.3
NetC23_2: C23.2 T2.2 | length 2.7
  TOP w0.35: T2.2@41.558,39.575 44.225,39.575 C23.2@44.25,39.55
NetC24_2: C24.2 T2.7 | length 2.7
  TOP w0.35: T2.7@41.558,45.925 44.225,45.925 C24.2@44.25,45.95
NetC31_2: C31.2 U40.1 XTAL1.1 | length 4.6
  TOP w0.25: U40.1@318.862,23.695 321.743,23.695 XTAL1.1@321.75,23.702 323.448,23.702 C31.2@323.45,23.7
NetC32_2: C32.2 U40.2 XTAL1.2 | length 4.6
  TOP w0.25: U40.2@318.862,24.965 321.717,24.965 XTAL1.2@321.75,24.998 323.448,24.998 C32.2@323.45,25
NetC35_1: 
NetC51_2: 
NetC63_1: 
NetC63_2: 
NetC66_2: C66.2 D22.1 K1.2 R126.2 | length 10.2
  TOP w1: R126.2@57.75,36.35 D22.1@60.8,36.35 60.8,34.95 C66.2@61.95,33.8 61.95,32.55 61.2,31.8 K1.2@61.2,30
NetC67_1: C67.1 R127.1 R128.1 U29.16 | length 3.7
  BOTTOM w0.5: U29.16@10.77,22 C67.1@12.25,22 R127.1@13.35,22 R128.1@14.45,22
NetC68_2: C68.2 U29.2 | length 4.2
  BOTTOM w0.5: U29.2@9.5,12.55 9.5,13.9 9.85,14.25 C68.2@12.25,14.25
NetC69_2: C69.2 U29.6 | length 2
  BOTTOM w0.5: C69.2@4.05,10.7 4.05,10.95 4.42,11.32 U29.6@4.42,12.55
NetC70_1: C70.1 U29.1 | length 2.4
  BOTTOM w0.5: C70.1@10.05,10.7 10.45,10.7 10.77,11.02 U29.1@10.77,12.55
NetC70_2: C70.2 U29.3 | length 2.5
  BOTTOM w0.5: U29.3@8.23,12.55 8.23,11.02 8.55,10.7 C70.2@9.05,10.7
NetC71_1: C71.1 U29.4 | length 1.9
  BOTTOM w0.5: U29.4@6.96,12.55 6.96,11.29 7.1,11.15 C71.1@7.1,10.7
NetC71_2: C71.2 U29.5 | length 2
  BOTTOM w0.5: U29.5@5.69,12.55 5.69,11.36 6.1,10.95 C71.2@6.1,10.7
NetC83_1: 
NetCN1_2: 
NetCN1_5: 
NetCN1_9: 
NetCN1_10: 
NetCR1_2: 
NetCR2_1: 
NetCR2_2: 
NetD9_1: D9.1 R135.1 R139.1 SW1.2 | length 5.1
  BOTTOM w0.3: R139.1@346.4,6.05 R135.1@347.9,6.05 347.93,6.02 SW1.2@347.93,2.5
NetD10_1: D10.1 R136.1 R140.1 SW2.2 | length 5.1
  BOTTOM w0.3: R140.1@346.4,14.9 R136.1@347.9,14.9 347.93,14.87 SW2.2@347.93,11.35
NetD11_1: D11.1 R137.1 R141.1 SW3.2 | length 5.1
  BOTTOM w0.3: R141.1@346.4,23.75 R137.1@347.9,23.75 347.93,23.72 SW3.2@347.93,20.2
NetD12_1: D12.1 R138.1 R142.1 SW4.2 | length 5.1
  BOTTOM w0.3: R142.1@346.4,32.6 R138.1@347.9,32.6 347.93,32.57 SW4.2@347.93,29.05
NetD20_2: D20.2 F1.2 K1.4
NetD25_1: D25.1 J1.4 R14.1 | length 3.3
  TOP w0.25: J1.4@217.55,24.55 R14.1@217.55,26.45 217.65,26.35 218.65,26.35 D25.1@218.8,26.2
NetD26_1: D26.1 J1.3 R13.1 | length 3.2
  TOP w0.25: D26.1@215.1,26.2 215.25,26.35 216.2,26.35 R13.1@216.3,26.45 J1.3@216.3,24.55
NetD27_2: D27.2 U50.6 | length 53.9
  TOP w0.3: D27.2@48.754,9.68 52.774,13.7 77.638,13.7 87.3,23.362 87.3,30 86.325,30.975 U50.6@84.662,30.975
NetD27_3: D27.3 U50.7 | length 54.5
  TOP w0.3: D27.3@46.214,9.68 50.884,14.35 77.369,14.35 86.65,23.631 86.65,29.7 86.025,30.325 U50.7@84.662,30.325
NetD27_4: D27.4 U50.8 | length 55.2
  TOP w0.3: D27.4@43.674,9.68 48.994,15 77.1,15 86,23.9 86,29.4 85.725,29.675 U50.8@84.662,29.675
NetD27_6: D27.6 U50.9 | length 61
  TOP w0.3: D27.6@41.134,50.32 44.464,53.65 58.75,53.65 67.85,44.55 78.027,44.55 82.65,39.927 82.65,29.894 83.518,29.025 U50.9@84.662,29.025
NetD27_7: D27.7 U50.11 | length 59
  TOP w0.3: D27.7@43.674,50.32 46.354,53 58.481,53 67.581,43.9 77.758,43.9 82,39.658 82,28.625 82.9,27.725 U50.11@84.662,27.725
NetD27_8: D27.8 U50.12 | length 56.3
  TOP w0.3: D27.8@46.214,50.32 48.244,52.35 58.212,52.35 67.312,43.25 77.488,43.25 81.35,39.388 81.35,28.3 82.575,27.075 U50.12@84.662,27.075
NetD27_9: D27.9 U50.13 | length 53.5
  TOP w0.3: D27.9@48.754,50.32 50.134,51.7 57.942,51.7 67.042,42.6 77.219,42.6 80.7,39.119 80.7,27.95 82.225,26.425 U50.13@84.662,26.425
NetD27_10: D27.10 U50.14 | length 50.1
  TOP w0.3: D27.10@51.294,50.32 58.403,50.32 66.773,41.95 76.95,41.95 80.05,38.85 80.05,27.6 81.875,25.775 U50.14@84.662,25.775
NetD28_2: D28.2 U50.15 | length 19.5
  TOP w0.3: D28.2@82.409,9.68 90.538,17.809 U50.15@90.538,25.775
NetD28_3: D28.3 U50.16 | length 21.8
  TOP w0.3: D28.3@79.869,9.68 89.2,19.011 89.2,26.15 89.475,26.425 U50.16@90.538,26.425
NetD28_4: D28.4 U50.17 | length 23.7
  TOP w0.3: D28.4@77.329,9.68 88.55,20.901 88.55,26.45 89.175,27.075 U50.17@90.538,27.075
NetD28_6: D28.6 U50.18 | length 46
  TOP w0.3: D28.6@74.789,50.32 78.119,53.65 87.977,53.65 93.738,47.888 94.8,46.827 94.8,30.35 92.175,27.725 U50.18@90.538,27.725
NetD28_7: D28.7 U50.20 | length 40.8
  TOP w0.3: D28.7@77.329,50.32 80.009,53 87.708,53 93.004,47.704 94.15,46.558 94.15,30.642 92.533,29.025 U50.20@90.538,29.025
NetD28_8: D28.8 U50.21 | length 35.8
  TOP w0.3: D28.8@79.869,50.32 81.899,52.35 87.438,52.35 92.16,47.629 93.5,46.288 93.5,30.912 92.263,29.675 U50.21@90.538,29.675
NetD28_9: D28.9 U50.22 | length 30.9
  TOP w0.3: D28.9@82.409,50.32 83.789,51.7 87.169,51.7 91.435,47.435 92.85,46.019 92.85,31.181 91.994,30.325 U50.22@90.538,30.325
NetD28_10: D28.10 U50.23 | length 25.3
  TOP w0.3: D28.10@84.949,50.32 87.63,50.32 92.2,45.75 92.2,31.45 91.725,30.975 U50.23@90.538,30.975
NetD29_2: D29.2 U51.6 | length 31.8
  TOP w0.3: D29.2@121.714,9.68 125.884,13.85 128.488,13.85 138.3,23.662 138.3,30 137.325,30.975 U51.6@135.662,30.975
NetD29_3: D29.3 U51.7 | length 32.4
  TOP w0.3: D29.3@119.174,9.68 123.994,14.5 128.219,14.5 137.65,23.931 137.65,29.7 137.025,30.325 U51.7@135.662,30.325
NetD29_4: D29.4 U51.8 | length 33
  TOP w0.3: D29.4@116.634,9.68 122.104,15.15 127.95,15.15 137,24.2 137,29.4 136.725,29.675 U51.8@135.662,29.675
NetD29_6: D29.6 U51.9 | length 43.8
  TOP w0.3: D29.6@114.094,50.32 117.424,53.65 128.077,53.65 133.8,47.927 133.8,29.744 134.519,29.025 U51.9@135.662,29.025
NetD29_7: D29.7 U51.11 | length 41.8
  TOP w0.3: D29.7@116.634,50.32 119.314,53 127.808,53 130.374,50.433 133.15,47.658 133.15,28.475 133.9,27.725 U51.11@135.662,27.725
NetD29_8: D29.8 U51.12 | length 39.1
  TOP w0.3: D29.8@119.174,50.32 121.204,52.35 127.538,52.35 129.783,50.106 132.5,47.388 132.5,28.15 133.575,27.075 U51.12@135.662,27.075
NetD29_9: D29.9 U51.13 | length 36.3
  TOP w0.3: D29.9@121.714,50.32 123.094,51.7 127.269,51.7 129.191,49.778 131.85,47.119 131.85,27.8 133.225,26.425 U51.13@135.662,26.425
NetD29_10: D29.10 U51.14 | length 32.9
  TOP w0.3: D29.10@124.254,50.32 127.73,50.32 128.6,49.45 131.2,46.85 131.2,27.45 132.875,25.775 U51.14@135.662,25.775
NetD30_2: D30.2 U51.15 | length 21.8
  TOP w0.3: U51.15@141.538,25.775 141.538,23.511 D30.2@155.369,9.68
NetD30_3: D30.3 U51.16 | length 23.2
  TOP w0.3: U51.16@141.538,26.425 140.475,26.425 140.2,26.15 140.2,22.309 D30.3@152.829,9.68
NetD30_4: D30.4 U51.17 | length 23.5
  TOP w0.3: U51.17@141.538,27.075 140.175,27.075 139.55,26.45 139.55,20.419 D30.4@150.289,9.68
NetD30_6: D30.6 U51.18 | length 26.1
  TOP w0.3: U51.18@141.538,27.725 143.175,27.725 145.8,30.35 145.8,48.371 D30.6@147.749,50.32
NetD30_7: D30.7 U51.20 | length 29.9
  TOP w0.3: U51.20@141.538,29.025 143.533,29.025 145.15,30.642 145.15,49.7 147.15,51.7 148.909,51.7 D30.7@150.289,50.32
NetD30_8: D30.8 U51.21 | length 32.7
  TOP w0.3: U51.21@141.538,29.675 143.263,29.675 144.5,30.912 144.5,49.969 146.881,52.35 150.799,52.35 D30.8@152.829,50.32
NetD30_9: D30.9 U51.22 | length 35.5
  TOP w0.3: U51.22@141.538,30.325 142.994,30.325 143.85,31.181 143.85,50.238 146.612,53 152.689,53 D30.9@155.369,50.32
NetD30_10: D30.10 U51.23 | length 38.3
  TOP w0.3: U51.23@141.538,30.975 142.725,30.975 143.2,31.45 143.2,50.508 146.342,53.65 154.579,53.65 D30.10@157.909,50.32
NetD31_2: D31.2 U52.6 | length 26.2
  TOP w0.3: D31.2@194.68,9.68 194.68,17.992 201.6,24.912 201.6,30 200.625,30.975 U52.6@198.962,30.975
NetD31_3: D31.3 U52.7 | length 25.9
  TOP w0.3: D31.3@192.14,9.68 192.14,16.371 200.95,25.181 200.95,29.7 200.325,30.325 U52.7@198.962,30.325
NetD31_4: D31.4 U52.8 | length 25.6
  TOP w0.3: D31.4@189.6,9.68 189.6,14.75 200.3,25.45 200.3,29.4 200.025,29.675 U52.8@198.962,29.675
NetD31_6: D31.6 U52.9 | length 41.1
  TOP w0.3: D31.6@187.06,50.32 190.39,53.65 198.75,53.65 200.6,51.8 200.6,42.9 197.45,39.75 197.45,29.393 197.819,29.025 U52.9@198.962,29.025
NetD31_7: D31.7 U52.11 | length 39.1
  TOP w0.3: D31.7@189.6,50.32 192.28,53 198.481,53 199.95,51.531 199.95,43.169 196.8,40.019 196.8,28.125 197.2,27.725 U52.11@198.962,27.725
NetD31_8: D31.8 U52.12 | length 36.3
  TOP w0.3: D31.8@192.14,50.32 194.17,52.35 198.212,52.35 199.3,51.262 199.3,43.438 196.15,40.288 196.15,27.8 196.875,27.075 U52.12@198.962,27.075
NetD31_9: D31.9 U52.13 | length 33.6
  TOP w0.3: D31.9@194.68,50.32 196.06,51.7 197.95,51.7 198.65,51 198.65,43.708 195.5,40.558 195.5,27.45 196.525,26.425 U52.13@198.962,26.425
NetD31_10: D31.10 U52.14 | length 28.9
  TOP w0.3: D31.10@197.22,50.32 197.22,43.197 194.85,40.827 194.85,27.1 196.175,25.775 U52.14@198.962,25.775
NetD32_2: D32.2 U52.15 | length 31.7
  TOP w0.3: U52.15@204.838,25.775 204.838,23.162 212.75,15.25 222.765,15.25 D32.2@228.335,9.68
NetD32_3: D32.3 U52.16 | length 32.1
  TOP w0.3: U52.16@204.838,26.425 203.775,26.425 203.5,26.15 203.5,23.55 212.45,14.6 220.875,14.6 D32.3@225.795,9.68
NetD32_4: D32.4 U52.17 | length 31.5
  TOP w0.3: U52.17@204.838,27.075 203.475,27.075 202.85,26.45 202.85,23.25 212.15,13.95 218.985,13.95 D32.4@223.255,9.68
NetD32_6: D32.6 U52.18 | length 30.8
  TOP w0.3: U52.18@204.838,27.725 206.475,27.725 209.1,30.35 209.1,39.9 219.52,50.32 D32.6@220.715,50.32
NetD32_7: D32.7 U52.20 | length 33.8
  TOP w0.3: U52.20@204.838,29.025 206.833,29.025 208.45,30.642 208.45,40.169 219.731,51.45 222.125,51.45 D32.7@223.255,50.32
NetD32_8: D32.8 U52.21 | length 36.5
  TOP w0.3: U52.21@204.838,29.675 206.563,29.675 207.8,30.912 207.8,40.438 219.412,52.05 224.065,52.05 D32.8@225.795,50.32
NetD32_9: D32.9 U52.22 | length 39.3
  TOP w0.3: U52.22@204.838,30.325 206.294,30.325 207.15,31.181 207.15,40.708 219.092,52.65 226.005,52.65 D32.9@228.335,50.32
NetD32_10: D32.10 U52.23 | length 42.1
  TOP w0.3: U52.23@204.838,30.975 206.025,30.975 206.5,31.45 206.5,40.977 218.773,53.25 227.945,53.25 D32.10@230.875,50.32
NetD33_2: D33.2 U53.6 | length 29.8
  TOP w0.3: D33.2@279.07,9.68 283.34,13.95 284.488,13.95 293,22.462 293,30 292.025,30.975 U53.6@290.362,30.975
NetD33_3: D33.3 U53.7 | length 30.4
  TOP w0.3: D33.3@276.53,9.68 281.45,14.6 284.219,14.6 292.35,22.731 292.35,29.7 291.725,30.325 U53.7@290.362,30.325
NetD33_4: D33.4 U53.8 | length 31.1
  TOP w0.3: D33.4@273.99,9.68 279.56,15.25 283.95,15.25 291.7,23 291.7,29.4 291.425,29.675 U53.8@290.362,29.675
NetD33_6: D33.6 U53.9 | length 41.5
  TOP w0.3: D33.6@271.45,50.32 274.83,53.7 283.258,53.7 287.6,49.358 287.6,30.644 289.219,29.025 U53.9@290.362,29.025
NetD33_7: D33.7 U53.11 | length 39.5
  TOP w0.3: D33.7@273.99,50.32 276.72,53.05 282.988,53.05 286.95,49.088 286.95,29.375 288.6,27.725 U53.11@290.362,27.725
NetD33_8: D33.8 U53.12 | length 36.8
  TOP w0.3: D33.8@276.53,50.32 278.61,52.4 282.719,52.4 286.3,48.819 286.3,29.05 288.275,27.075 U53.12@290.362,27.075
NetD33_9: D33.9 U53.13 | length 34
  TOP w0.3: D33.9@279.07,50.32 280.5,51.75 282.45,51.75 285.65,48.55 285.65,28.7 287.925,26.425 U53.13@290.362,26.425
NetD33_10: D33.10 U53.14 | length 29.8
  TOP w0.3: D33.10@281.61,50.32 285,46.93 285,28.35 287.575,25.775 U53.14@290.362,25.775